# Altium PCB VCO_RAW.PcbDoc
Units mil, origin at the board's own origin, x right, y up, seen from the top; angles counter-clockwise.
Board outline 1102.36 x 3937.01 mil, 2 copper layers (Top Layer, Bottom Layer); 31 components, 18 nets, 120 pads, 37 vias.
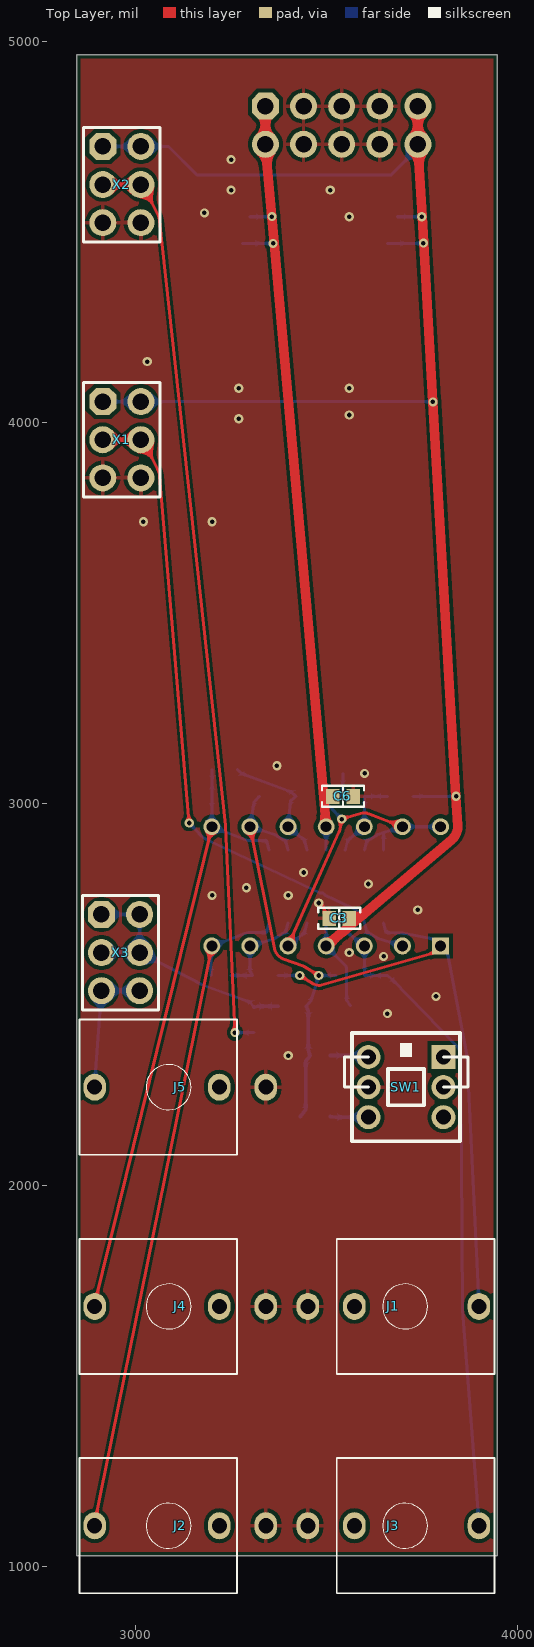
[diagram p0: Top Layer view]
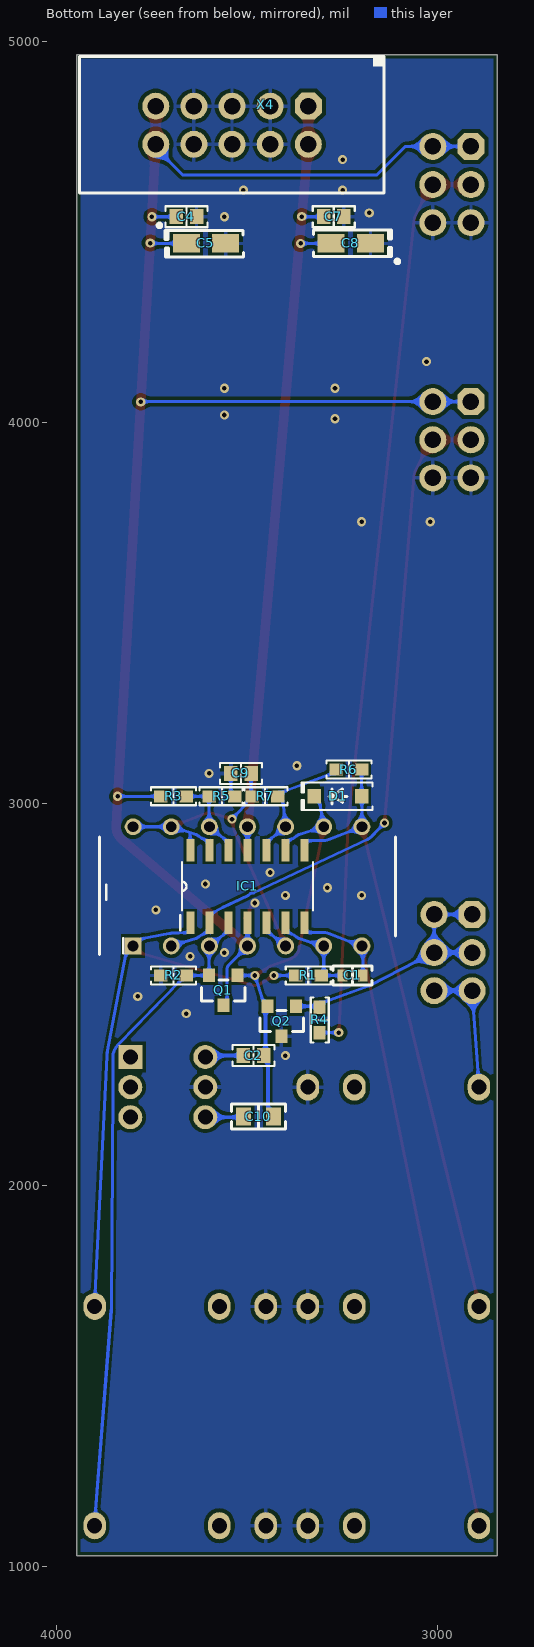
[diagram p1: Bottom Layer view, seen from below]
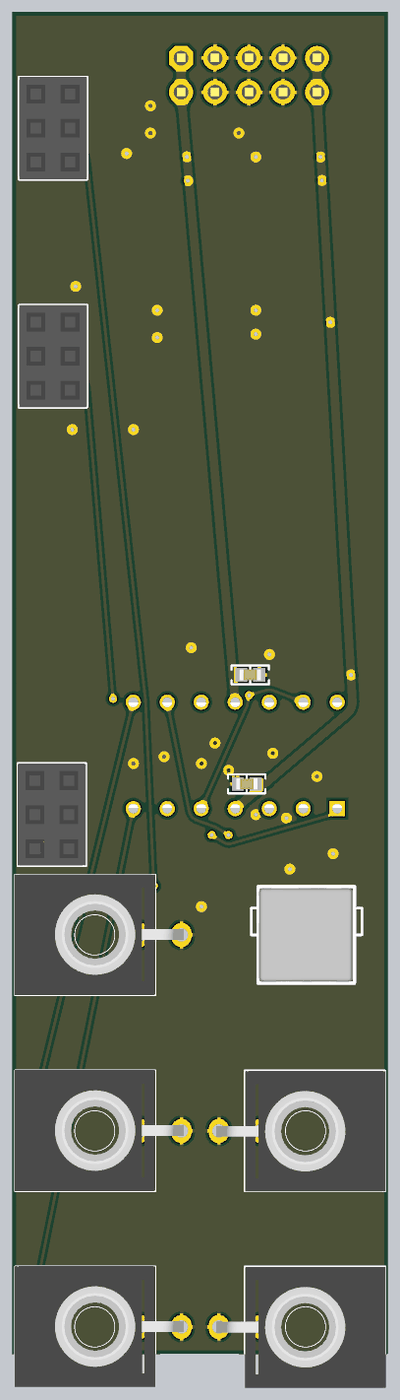
[diagram p2: 3D render of the assembled board from above, using the file's embedded part models]
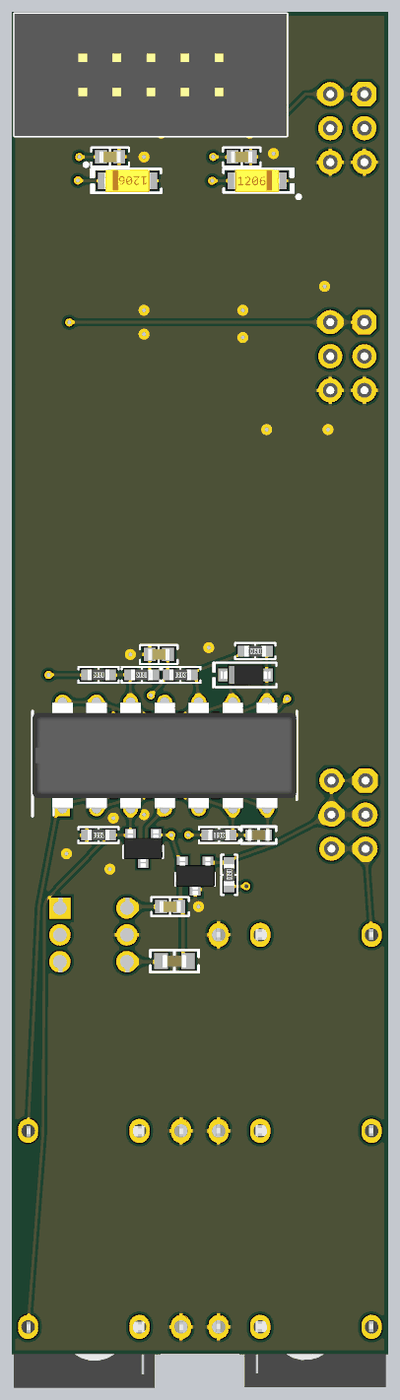
[diagram p3: 3D render of the assembled board from below, using the file's embedded part models]

## Layer stack, top to bottom
Top Solder: solder mask 0.4, Solder Resist, Dk 3.5
Top Layer: signal copper 1.4
Dielectric 1: dielectric 12.6, FR-4, Dk 4.8
Bottom Layer: signal copper 1.4
Bottom Solder: solder mask 0.4, Solder Resist, Dk 3.5

## Board outline
2845,1027.99 3947.36,1027.99 3947.36,4965 2845,4965

## Design rules (kind name [scope] priority, off if disabled: settings)
BoardOutlineClearance [All] p1: gap=10 ignorepadtopadclearanceinfootprint=FALSE except(0: Arc-SplitContinuation Track-SplitContinuation SMDPad-SplitContinuation THPad-SplitContinuation Via-SplitContinuation Fill-SplitContinuation Poly-SplitContinuation Region-SplitContinuation Text-SplitContinuation)
Clearance [All] p1: gap=10 ignorepadtopadclearanceinfootprint=FALSE except(8: Arc-Arc Arc-Track Arc-SMDPad Arc-Fill Arc-Poly Arc-Region Track-Track Track-SMDPad Track-Fill Track-Poly Track-Region SMDPad-SMDPad SMDPad-Fill SMDPad-Poly SMDPad-Region)
PolygonConnect [All] p1: thpad.connectstyle=Relief thpad.reliefconductorwidth=10 thpad.reliefentries=4 thpad.polygonreliefangle="90 Angle" thpad.airgapwidth=10 smdpad.connectstyle=Relief smdpad.reliefconductorwidth=10 smdpad.reliefentries=4 smdpad.polygonreliefangle="90 Angle" smdpad.airgapwidth=10 via.connectstyle=Direct via.reliefconductorwidth=10 via.reliefentries=4 via.polygonreliefangle="90 Angle" via.airgapwidth=10
RoutingVias [All] p1: holewidth=12 width=24 viastyle="Through Hole" minholewidth=12 minwidth=24 maxholewidth=12 maxwidth=24
SolderMaskExpansion [All] p1: expansion=4 istentingtop=FALSE
Width [All] p1: maxlimit=25 minlimit=8 preferedwidth=8
30 further rules are at their usual default settings.

## Components (designator, comment, footprint, x,y, rotation, side; value= is the part's Value field where it differs from the comment)
C1 "0.15 µF" "MURATA GCM188 0603_1608" 3223.43,2550 r180 bottom
C2 "0.22 µF" "CAP 0603_1608" 3483.43,2340 r180 bottom
C3 "0.1 µF" "CAP 0603_1608" 3533.43,2700 r0 top
C4 "0.1 µF" "CAP 0603_1608" 3659.65,4540 r0 bottom
C5 "10µF" "CAP POL 1206_3216" 3608.43,4470 r180 bottom
C6 "0.1 µF" "CAP 0603_1608" 3543.43,3020 r0 top
C7 "0.1 µF" "CAP 0603_1608" 3273.43,4540 r180 bottom
C8 "10µF" "CAP POL 1206_3216" 3228.43,4470 r0 bottom
C9 "0.22 µF" "CAP 0603_1608" 3516.57,3080 r180 bottom
C10 "2.2 µF" "MURATA GRM188 0603_1608" 3470.63,2180 r180 bottom
D1 "1N4148W-TP" SOD-123 3262.01,3020 r0 bottom
IC1 "TL074CN" DIP_SMD-14 3499.37,2783.78 r90 bottom
J1 "PWM_OUT" THONKICONN 3451.3,1681.89 r270 top
J2 "TRI_OUT" THONKICONN 3341.06,1106.73 r90 top
J3 "SAW_OUT" THONKICONN 3451.3,1106.73 r270 top
J4 "PULSE_OUT" THONKICONN 3341.06,1681.89 r90 top
J5 "CV_IN" THONKICONN 3341.06,2257.05 r90 top
Q1 "MMBT3904-7-F" "DIODES SOT-23-3" 3562.6,2510.63 r270 bottom
Q2 "MMBT3904-7-F" "DIODES SOT-23-3" 3410,2430 r270 bottom
R1 "10 kOhms" "YAGEO RES 0603_1608" 3340,2550 r180 bottom
R2 "100 kOhms" "YAGEO RES 0603_1608" 3693.46,2550 r180 bottom
R3 "10 kOhms" "YAGEO RES 0603_1608" 3693.46,3020 r0 bottom
R4 "100 kOhms" "YAGEO RES 0603_1608" 3310,2433.46 r270 bottom
R5 "10 kOhms" "YAGEO RES 0603_1608" 3566.54,3020 r0 bottom
R6 "100 kOhms" "YAGEO RES 0603_1608" 3233.46,3090 r0 bottom
R7 "10 kOhms" "YAGEO RES 0603_1608" 3453.46,3020 r180 bottom
SW1 "VCO/LFO" PB_SW_LATCH 3806.88,2335.82 r0 top
X1 "Connector, 6pin, 2.54mm, 500VAC, 3A" "CON: PBD-6" 2963.39,3955.12 r270 top
X2 "Connector, 6pin, 2.54mm, 500VAC, 3A" "CON: PBD-6" 2963.39,4624.41 r270 top
X3 "Connector, 6pin, 2.54mm, 500VAC, 3A" "CON: PBD-6" 2960,2610 r270 top
X4 "Connector, 10pin, 2.54mm, 250VAC, 3A" "CON: IDC-10MS" 3540,4780 r0 bottom

## Footprints (in the part's own frame and the unit in brackets; to place one, negate y for a bottom-side part, rotate by r counter-clockwise, add the part's x,y. Pads: shape width x height; smd on the part's side, far side on the other; paste and mask are expansions set on the pad)
"CAP 0603_1608" [mm] "Chip Capacitor, 2-Leads, Body 1.60x0.80mm, IPC Medium Density"
  rect 0.9x1 smd: 1(-0.675,0) 2(0.675,0)
  silkscreen extent -1.4,-0.7 1.4,0.7, body extent -0.8,-0.41 0.8,0.41, height 0.82
"CAP POL 1206_3216" [mm] "Molded Capacitor, 2-Leads, Body 3.20x1.6mm, IPC Medium Density"
  rect 1.8x1.23 smd: 1(-1.31,0) 2(1.31,0)
  silkscreen extent -3.22,-0.9 2.5,1.32, body extent -1.72,-0.85 1.71,0.85, height 1.7
"CON: IDC-10MS" [mm] "IDC-10MS 10 pin PCB-mount header"
  oct 1.8x1.8 hole 1.1: 1(-5.08,-1.27)
  round 1.8 hole 1.1: 2(-5.08,1.27) 3(-2.54,-1.27) 4(-2.54,1.27) 5(0,-1.27) 6(0,1.27) 7(2.54,-1.27) 8(2.54,1.27) 9(5.08,-1.27) 10(5.08,1.27)
  round 0.5 on Mech1: ""(-9.6,-4)
  silkscreen extent -10.14,-4.57 10.16,4.53, body extent -10.14,-4.57 10.16,4.53, height 9
"CON: PBD-6" [mm] "PBD-6"
  oct 1.8x1.8 hole 1.1: 1(-2.54,-1.27)
  round 1.8 hole 1.1: 2(-2.54,1.27) 3(0,-1.27) 4(0,1.27) 5(2.54,-1.27) 6(2.54,1.27)
  silkscreen extent -3.81,-2.54 3.81,2.54, body extent -3.81,-2.54 3.81,2.54, height 8.5
"DIODES SOT-23-3" [mm] "SOT23, 3-Leads, Body 2.90x2.40mm, Pitch 0.95mm, IPC Medium Density"
  rect 0.9x0.8 smd: 1(-1,0.95) 2(-1,-0.95) 3(1,0)
  silkscreen extent -0.7,-1.45 0.7,1.45, body extent -1.41,-1.45 1.41,1.45, height 1.5
DIP_SMD-14 [mm] "Combo footprint for opamps that i have"
  rect 1.13x1.13 hole 0.73: 1(-3.97,7.62)
  rect 1.5x0.533 smd: 1(-2.441,3.81) 2(-2.441,2.54) 3(-2.441,1.27) 4(-2.441,0) 5(-2.441,-1.27) 6(-2.441,-2.54) 7(-2.441,-3.81) 8(2.416,-3.81) 9(2.416,-2.54) 10(2.416,-1.27) 11(2.416,0) 12(2.416,1.27) 13(2.416,2.54) 14(2.416,3.81)
  round 1.13 hole 0.73: 2(-3.97,5.08) 3(-3.97,2.54) 4(-3.97,0) 5(-3.97,-2.54) 6(-3.97,-5.08) 7(-3.97,-7.62) 8(3.97,-7.62) 9(3.97,-5.08) 10(3.97,-2.54) 11(3.97,0) 12(3.97,2.54) 13(3.97,5.08) 14(3.97,7.62)
  silkscreen extent -4.53,-9.84 3.3,9.85, body extent -3.94,-9.84 3.94,9.84, height 5.27
"MURATA GCM188 0603_1608" [mm] "Chip Capacitor, 2-Leads, Body 1.60x0.80mm"
  rect 0.65x0.8 smd: 1(-0.675,0) 2(0.675,0)
  silkscreen extent -1.3,-0.63 1.3,0.63, body extent -0.85,-0.45 0.85,0.45, height 0.9
"MURATA GRM188 0603_1608" [mm] "Chip Capacitor, 2-Leads, Body 1.60x0.80mm"
  rect 1x1.2 smd: 1(-1,0) 2(1,0)
  silkscreen extent -1.8,-0.83 1.8,0.83, body extent -0.9,-0.5 0.9,0.5, height 1
PB_SW_LATCH [mm] "Pushbiutton switch latching DPDT SHOU HAN 7-7 ZS"
  rect 1.6x1.6 hole 1: 1(0,0)
  round 1.6 hole 1: 2(0,-2) 3(0,-4) 4(-5,0) 5(-5,-2) 6(-5,-4)
  silkscreen extent -6.6,-5.6 1.65,1.6, body extent -6.04,-5.5 0.96,1.5, height 12.4
SOD-123 [mm] "SOD, 2-Leads, Body 1.55x3.70mm, IPC Medium Density"
  rect 0.9x0.95 smd: 1(-1.575,0) 2(1.575,0)
  silkscreen extent -2.3,-0.92 2.41,0.92, body extent -1.86,-0.78 1.86,0.77, height 1.35
THONKICONN [mm]
  oval 1.8x1.5 hole 1: 1(0,0) 2(0,3.1) 3(0,11.4)
  silkscreen extent -4.5,1.92 4.5,12.42, body extent -4.47,-0.18 4.53,12.45, height 14.5
"YAGEO RES 0603_1608" [mm] "Chip Resistor, 2-Leads, Body 1.60x0.80mm"
  rect 0.9x0.8 smd: 1(-0.85,0) 2(0.85,0)
  silkscreen extent -1.5,-0.6 1.5,0.6, body extent -0.8,-0.4 0.8,0.4, height 0.45

## Part data
C1: library part GCM188R71H154KA64D, "CAP CER 0.15UF 50V X7R 0603", Device Package="0603 (1608 Metric)", Manufacturer="Murata Electronics", Operating Temperature="-55°C ~ 125°C", Ratings=AEC-Q200, Supplier Part Number 1=490-11960-1-ND, Temperature Coefficient=X7R, Tolerance=±10%, Voltage - Rated=50V, Applications=Automotive, Capacitance="0.15 µF", ComponentLink1Description=Datasheet, ComponentLink1URL=https://www.murata.com/~/media/webrenewal/support/library/catalog/products/capacitor/mlcc/c03e.ashx?la=en-us, ComponentLink2Description="DigiKey Link", ComponentLink2URL=https://www.digikey.com/en/products/detail/murata-electronics/GCM188R71H154KA64D/4903958, LastUpdated="7/20/2024 12:25:02 AM", Lifecycle Status=Active, Minimum Order=1, Mounting Type="Surface Mount, MLCC", Package / Case="0603 (1608 Metric)", Packaging=TapeAndReel, Part Number=GCM188R71H154KA64D, Part Status=Active, PartId=6776, Price=0.02, Series=GCM, Size / Dimension="0.063\" L x 0.031\" W (1.60mm x 0.80mm)", Supplier 1=DigiKey, Thickness (Max)="0.035\" (0.90mm)"
C2 C9: library part CC0603KRX7R9BB224, "CAP CER 0.22UF 50V X7R 0603", Device Package="0603 (1608 Metric)", Manufacturer=Yageo, Operating Temperature="-55°C ~ 125°C", Supplier Part Number 1=311-3374-1-ND, Temperature Coefficient=X7R, Tolerance=±10%, Voltage - Rated=50V, Applications="General Purpose", Capacitance="0.22 µF", ComponentLink1Description=Datasheet, ComponentLink1URL=https://www.yageo.com/upload/media/product/productsearch/datasheet/mlcc/UPY-GPHC_X7R_6.3V-to-50V_18.pdf, ComponentLink2Description="DigiKey Link", ComponentLink2URL=https://www.digikey.com/en/products/detail/yageo/CC0603KRX7R9BB224/5883804, LastUpdated="2/9/2024 8:10:26 PM", Lifecycle Status=Active, Minimum Order=1, Mounting Type="Surface Mount, MLCC", Package / Case="0603 (1608 Metric)", Packaging=TapeAndReel, Part Number=CC0603KRX7R9BB224, Part Status=Active, PartId=5406, Price=0.04, Series=CC, Size / Dimension="0.063\" L x 0.031\" W (1.60mm x 0.80mm)", Supplier 1=DigiKey, Thickness (Max)="0.035\" (0.90mm)"
C3 C4 C6 C7: library part C0603C104K5RAC7411, "CAP CER 0.1UF 50V X7R 0603", Device Package="0603 (1608 Metric)", Manufacturer=KEMET, Operating Temperature="-55°C ~ 125°C", Supplier Part Number 1=399-C0603C104K5RAC7411CT-ND, Temperature Coefficient=X7R, Tolerance=±10%, Voltage - Rated=50V, Applications="Bypass, Decoupling", Capacitance="0.1 µF", ComponentLink1Description=Datasheet, ComponentLink1URL=https://api.kemet.com/component-edge/download/datasheet/C0603C104K5RAC7411.pdf, ComponentLink2Description="DigiKey Link", ComponentLink2URL=https://www.digikey.com/en/products/detail/kemet/C0603C104K5RAC7411/3317013, LastUpdated="2/9/2024 8:10:30 PM", Lifecycle Status=Active, Minimum Order=1, Mounting Type="Surface Mount, MLCC", Package / Case="0603 (1608 Metric)", Packaging=TapeAndReel, Part Number=C0603C104K5RAC7411, Part Status=Active, PartId=2233, Price=0.01, Series="SMD Comm X7R", Size / Dimension="0.063\" L x 0.031\" W (1.60mm x 0.80mm)", Supplier 1=DigiKey, Thickness (Max)="0.035\" (0.90mm)"
C5 C8: library part T491A106K010AT, "CAP TANT 10UF 10% 10V 1206", Device Package="1206 (3216 Metric)", ESR (Equivalent Series Resistance)=3.8Ohm, Lifetime @ Temp.="2000 Hrs @ 125°C", Manufacturer=KEMET, Manufacturer Size Code=A, Operating Temperature="-55°C ~ 125°C", Supplier Part Number 1=399-3684-1-ND, Tolerance=±10%, Voltage - Rated=10V, Capacitance=10µF, ComponentLink1Description=Datasheet, ComponentLink1URL=https://api.kemet.com/component-edge/download/datasheet/T491A106K010AT.pdf, ComponentLink2Description="DigiKey Link", ComponentLink2URL=http://digikey.com/product-detail/en/kemet/T491A106K010AT/399-3684-1-ND/819009, Features="General Purpose", Height - Seated (Max)="0.071\" (1.80mm)", LastUpdated="9/2/2020 1:15:58 AM", Lifecycle Status=Active, Minimum Order=1, Mounting Type="Surface Mount", Package / Case="1206 (3216 Metric)", Packaging=TapeAndReel, Part Number=T491A106K010AT, Part Status=Active, PartId=330, Price=0.07, Series=T491, Size / Dimension="0.126\" L x 0.063\" W (3.20mm x 1.60mm)", Supplier 1=DigiKey, Type=Molded
C10: library part GRM188R61H225ME11D, "CAP CER 2.2UF 50V X5R 0603", Device Package="0603 (1608 Metric)", Manufacturer="Murata Electronics", Operating Temperature="-55°C ~ 85°C", Supplier Part Number 1=490-12740-1-ND, Temperature Coefficient=X5R, Tolerance=±20%, Voltage - Rated=50V, Applications="General Purpose", Capacitance="2.2 µF", ComponentLink1Description=Datasheet, ComponentLink1URL=https://search.murata.co.jp/Ceramy/image/img/A01X/G101/ENG/GRM188R61H225ME11-01.pdf, ComponentLink2Description="DigiKey Link", ComponentLink2URL=https://www.digikey.com/en/products/detail/murata-electronics/GRM188R61H225ME11D/4905365, LastUpdated="7/20/2024 12:23:20 AM", Lifecycle Status=Active, Minimum Order=1, Mounting Type="Surface Mount, MLCC", Package / Case="0603 (1608 Metric)", Packaging=TapeAndReel, Part Number=GRM188R61H225ME11D, Part Status=Active, PartId=12610, Price=0.03, Series=GRM, Size / Dimension="0.063\" L x 0.031\" W (1.60mm x 0.80mm)", Supplier 1=DigiKey, Thickness (Max)="0.039\" (1.00mm)"
D1: "DIODE GEN PURP 100V 150MA SOD123", Capacitance @ Vr, F="2pF @ 0V, 1MHz", Current - Average Rectified (Io)=150mA, Current - Reverse Leakage @ Vr="1 µA @ 75 V", Manufacturer="Micro Commercial Co", Operating Temperature - Junction="-65°C ~ 150°C", Package / Case=SOD-123, Supplier Part Number 1=1N4148WTPMSCT-ND, Voltage - DC Reverse (Vr) (Max)="100 V", Voltage - Forward (Vf) (Max) @ If="1.25 V @ 150 mA", ComponentLink1Description=Datasheet, ComponentLink1URL=https://www.mccsemi.com/pdf/Products/1N4148W(SOD123).pdf, ComponentLink2Description="DigiKey Link", ComponentLink2URL=https://www.digikey.com/en/products/detail/micro-commercial-co/1N4148W-TP/717196, Diode Type=Standard, LastUpdated="6/3/2024 7:54:46 PM", Lifecycle Status=Active, Minimum Order=1, Mounting Type="Surface Mount", Packaging=TapeAndReel, Part Number=1N4148W-TP, Part Status=Active, PartId=999, Price=0.01, Reverse Recovery Time (trr)="4 ns", Series=-, Speed="Small Signal =< 200mA (Io), Any Speed", Supplier 1=DigiKey, Supplier Device Package=SOD-123
IC1: "Integrated Circuit", Manufacturer_Name="Texas Instruments", Mouser Part Number=595-TL074CN, Arrow Part Number=TL074CN, Arrow Price/Stock=https://www.arrow.com/en/products/tl074cn/texas-instruments?utm_currency=USD&region=nac, Datasheet Link=https://www.ti.com/lit/ds/symlink/tl074.pdf?HQS=TI-null-null-mousermode-df-pf-null-wwe&ts=1598513500878&ref_url=https%253A%252F%252Feu.mouser.com%252F, Height=5.08mm, Manufacturer_Part_Number=TL074CN, Mouser Price/Stock=https://www.mouser.co.uk/ProductDetail/Texas-Instruments/TL074CN?qs=AMJt07B76uv7dLYnj7iLiQ%3D%3D
J1 J2 J3 J4 J5: library part PJ-301M-3P, "THONKICONN metal"
Q1 Q2: "TRANS NPN 40V 0.2A SOT23-3", Current - Collector (Ic) (Max)="200 mA", Current - Collector Cutoff (Max)="50nA (ICBO)", DC Current Gain (hFE) (Min) @ Ic, Vce="100 @ 10mA, 1V", Frequency - Transition=300MHz, Manufacturer="Diodes Incorporated", Operating Temperature="-55°C ~ 150°C (TJ)", Package / Case="TO-236-3, SC-59, SOT-23-3", Power - Max="300 mW", Supplier Device Package=SOT-23-3, Supplier Part Number 1=MMBT3904-FDICT-ND, Voltage - Collector Emitter Breakdown (Max)="40 V", ComponentLink1Description=Datasheet, ComponentLink1URL=https://www.diodes.com/assets/Datasheets/ds30036.pdf, ComponentLink2Description="DigiKey Link", ComponentLink2URL=https://www.digikey.com/en/products/detail/diodes-incorporated/MMBT3904-7-F/814494, LastUpdated="2/8/2024 9:54:04 PM", Lifecycle Status=Active, Minimum Order=1, Mounting Type="Surface Mount", Packaging=TapeAndReel, Part Number=MMBT3904-7-F, Part Status=Active, PartId=85, Price=0.01, Series=-, Supplier 1=DigiKey, Transistor Type=NPN, Vce Saturation (Max) @ Ib, Ic="300mV @ 5mA, 50mA"
R1 R3 R5 R7: library part AA0603FR-0710KL, "RES SMD 10K OHM 1% 1/10W 0603", Device Package="0603 (1608 Metric)", Manufacturer=Yageo, Operating Temperature="-55°C ~ 155°C", Power (Watts)="0.1W, 1/10W", Ratings=AEC-Q200, Supplier Device Package=0603, Supplier Part Number 1=13-AA0603FR-0710KLCT-ND, Temperature Coefficient=±150ppm/°C, Tolerance=±1%, ComponentLink1Description=Datasheet, ComponentLink1URL=https://www.yageo.com/upload/media/product/productsearch/datasheet/rchip/PYu-AA_51_RoHS_L_3.pdf, ComponentLink2Description="DigiKey Link", ComponentLink2URL=https://www.digikey.com/en/products/detail/yageo/AA0603FR-0710KL/5888698, Composition="Thick Film", Features="Anti-Sulfur, Automotive AEC-Q200, Moisture Resistant", Height - Seated (Max)="0.022\" (0.55mm)", LastUpdated="7/25/2024 9:19:15 AM", Lifecycle Status=Active, Minimum Order=1, Number of Terminations=2, Package / Case="0603 (1608 Metric)", Packaging=TapeAndReel, Part Number=AA0603FR-0710KL, Part Status=Active, PartId=64302, Price=0.01, Resistance="10 kOhms", Series=AA, Size / Dimension="0.063\" L x 0.031\" W (1.60mm x 0.80mm)", Supplier 1=DigiKey
R2 R4 R6: library part AA0603FR-07100KL, "RES SMD 100K OHM 1% 1/10W 0603", Device Package="0603 (1608 Metric)", Manufacturer=Yageo, Operating Temperature="-55°C ~ 155°C", Power (Watts)="0.1W, 1/10W", Ratings=AEC-Q200, Supplier Device Package=0603, Supplier Part Number 1=13-AA0603FR-07100KLCT-ND, Temperature Coefficient=±150ppm/°C, Tolerance=±1%, ComponentLink1Description=Datasheet, ComponentLink1URL=https://www.yageo.com/upload/media/product/productsearch/datasheet/rchip/PYu-AA_51_RoHS_L_3.pdf, ComponentLink2Description="DigiKey Link", ComponentLink2URL=https://www.digikey.com/en/products/detail/yageo/AA0603FR-07100KL/5888687, Composition="Thick Film", Features="Anti-Sulfur, Automotive AEC-Q200, Moisture Resistant", Height - Seated (Max)="0.022\" (0.55mm)", LastUpdated="7/25/2024 9:19:03 AM", Lifecycle Status=Active, Minimum Order=1, Number of Terminations=2, Package / Case="0603 (1608 Metric)", Packaging=TapeAndReel, Part Number=AA0603FR-07100KL, PartId=78895, Price=0.01, Resistance="100 kOhms", Series=AA, Size / Dimension="0.063\" L x 0.031\" W (1.60mm x 0.80mm)", Supplier 1=DigiKey
SW1: library part Push_SW_DPDT
X1 X2 X3: library part PBD-6, CurrentMax=3A, Manufacturer=Connfly, VoltageMax=500VAC, CommentText="\"Разъем\"", helpurl=https://www.chipdip.ru/product/pbd-6, Multichannel=6pin, PartNumber=PBD-6, Pitch=2.54mm, TypeConnector=Connector, ValueManufacturerPartNumber="Connector, 6pin, 2.54mm, 500VAC, 3A"
X4: library part IDC-10, CurrentMax=3A, Manufacturer=Connfly, VoltageMax=250VAC, CommentText="\"Разъем\"", helpurl=https://www.chipdip.ru/product/idc-10ms, Multichannel=10pin, PartNumber=IDC-10, Pitch=2.54mm, TypeConnector=Connector, ValueManufacturerPartNumber="Connector, 10pin, 2.54mm, 250VAC, 3A"

## Via types
v1: diameter 24, hole 12, Top Layer to Bottom Layer, 37 vias

## Nets (pads, with @x,y where several pads share a name; then routed paths per layer and width w, separated by ;. In a path a pad name is that pad's centre, name@x,y a point inside that pad or via, vN(x,y) a via of type N, cw(c..) or ccw(c..) an arc to the next point about the centre after c; other vN are vias at no path point)
-12: C6.1 C7.1 C8.2 IC1.11 X4.1 X4.2 | length 2095.3
  Top Layer w25: X4.1 3340,4807.07 X4.2 3340,4729.9 ccw(c3365,4730) 3340.09,4727.82 3356.81,4540.26 3363.04,4470.27 3492.44,3017.83 IC1.11@3499.37,2940.08
  Bottom Layer w8: C8.2 v1(3360,4470) ; C7.1 3356.69,4540 v1(3356.97,4540.28) ; IC1.11@3499.37,2878.89 3499.37,2904.42 IC1.11@3499.37,2940.08
CV_B: J5.3 X3.5 X3.6 | length 353.6
  Bottom Layer w8: J5.3 2892.24,2262.95 X3.5 X3.6
CV_T: Q2.1 R4.1 X3.1 X3.2 X3.3 X3.4 | length 697.7
  Bottom Layer w8: X3.3 X3.4 ; X3.1 X3.2 X3.4 ; R4.1 3298.25,2480.65 3180.01,2522.95 cw(c3184.05,2534.25) 3178.53,2523.6 3013.67,2609.11 ccw(c3010,2602) X3.4
  Bottom Layer w10: R4.1 3320.75,2469.37 Q2.1
FREQ_B: C3.1 C4.1 C5.2 C6.2 C7.2 C8.1 C9.1 J1.1 J2.1 J3.1 J4.1 J5.1 Q2.3 R2.1 R5.1 SW1.5 X1.5 X1.6 X2.5 X2.6 X4.3 X4.4 X4.5 X4.6 X4.7 X4.8 | length 114.9
  Top Layer w8: v1(3480,2740) 3494.24,2725.76 3494.24,2712.61 C3.1
  Bottom Layer w8: R5.1 3543.15,3031.75 C9.1
  other v1: 3400,2340 3660,2450 3787.42,2495.27 3650,2600 3560,2610 3739.56,2721.86 3200,2760 3400,2760 3290,2780 3610,2790 3440,2820 3600,3080 3370,3100 3020,3740 3200,3740 3270,4010 3560,4020 3270,4090 3560,4090 3030,4160 3560,4540 3180,4550 3250,4610 3510,4610 3250,4690
FREQ_T: C3.2 C4.2 C5.1 IC1.4 Q1.3 R3.2 X1.1 X1.2 X2.1 X2.2 X4.9 X4.10 | length 4637.7
  Top Layer w25: IC1.4@3499.37,2627.48 3828.28,2905.93 ccw(c3799.37,2940.08) 3844.04,2942.68 3839.54,3019.97 3779.29,4054.57 3755.04,4470.98 3751.02,4540.06 3740.04,4728.61 cw(c3765,4730) X4.10 X4.9
  Bottom Layer w8: X1.1 3778.67,4055.12 v1(3779.22,4054.56) ; X2.1 X2.2 3085.59,4724.41 3160,4650 3670,4650 3740,4720 X4.10 ; IC1.4@3499.37,2687.69 3499.37,2662.16 3499.37,2627.48 3549.53,2576.1 cw(c3540.94,2567.72) 3552.94,2567.72 3552.94,2484.98 Q1.3 ; C5.1 3753.49,4470 v1(3754.43,4470.94) ; C4.2 v1(3750,4540) ; R3.2 v1(3840,3020)
FREQ_W: R4.2 X2.3 X2.4 | length 2398.4
  Top Layer w8: X2.3 X2.4 cw(c3013.39,4616.41) 3020.53,4620.01 3057.48,4546.75 cw(c3013.39,4524.41) 3062.53,4529.77 3235.4,2944.01 cw(c3199.37,2940.08) 3235.58,2941.71 v1(3260,2400)
  Bottom Layer w8: v1(3260,2400) R4.2
NetC1_1: C1.1 IC1.6 R1.2 | length 266.1
  Bottom Layer w8: C1.1 3258.8,2550 3292.82,2550 R1.2 3299.37,2561.75 IC1.6@3299.37,2627.48 ; IC1.6@3399.37,2687.69 3392.87,2662.16 3392.28,2662.04 ccw(c3399.37,2626.5) 3379.25,2656.64 3366.52,2648.17 cw(c3359.87,2658.16) 3363.52,2646.72 3303.29,2627.73 cw(c3300.83,2635.35) IC1.6@3299.37,2627.48 ; IC1.6@3299.37,2626.5 IC1.6@3299.37,2627.48 ; IC1.6@3299.37,2626.5 3299.65,2626.59 IC1.6@3299.37,2627.48 ; IC1.6@3299.37,2626.5 IC1.6@3299.37,2627.48
NetC1_2: C1.2 IC1.7 J2.3 | length 1806.2
  Top Layer w8: J2.3 2892.24,1112.64 IC1.7@3199.37,2627.48
  Bottom Layer w8: C1.2 3196.85,2561.75 3196.85,2620.54 cw(c3204.85,2620.5) 3197.67,2624.04 IC1.7@3199.37,2627.48 ; IC1.7@3199.7,2626.63 IC1.7@3199.37,2627.48 ; IC1.7@3349.37,2687.69 3342.87,2662.74 3299.37,2662.74 ccw(c3299.37,2626.5) 3286.23,2660.28 3203.21,2627.99 cw(c3200.27,2635.43) IC1.7@3199.37,2627.48
NetC2_1: C2.1 SW1.4 | length 100.4
  Bottom Layer w10: C2.1 3583.55,2340 SW1.4
NetC2_2: C2.2 C10.2 D1.2 IC1.9 Q1.1 Q2.2 | length 1112.7
  Top Layer w8: IC1.9@3299.37,2940.08 3363.84,2620.32 ccw(c3399.37,2627.48) 3386.92,2593.44 3438.93,2574.42 cw(c3430,2550) 3443.52,2572.21 v1(3480,2550)
  Bottom Layer w8: D1.2 3310.3,3005.3 3299.37,2940.08 3363.48,2919.86 cw(c3359.87,2908.42) 3366.52,2918.41 3379.25,2909.93 ccw(c3399.37,2940.08) 3392.27,2904.54 3392.87,2904.42 IC1.9@3399.37,2878.89 ; Q2.2 3459.15,2483.09 v1(3480,2550) 3513.45,2550 Q1.1
  Bottom Layer w10: C10.2 3445.94,2198.62 3445.94,2325.31 C2.2 3452.26,2354.68 3452.26,2456.65 Q2.2
NetC9_2: C9.2 IC1.5 IC1.13 IC1.14 R7.1 | length 1026.8
  Top Layer w8: IC1.5@3399.37,2627.48 3532.46,2925.29 ccw(c3499.37,2940.08) 3534.99,2933.37 v1(3540,2960) 3543.71,2961.74 cw(c3547.1,2954.49) 3544.87,2962.18 3589.39,2974.92 cw(c3599.37,2940.08) 3612.51,2973.86 IC1.13@3699.37,2940.08
  Bottom Layer w8: IC1.5@3399.85,2626.89 3399.37,2627.48 3442.87,2662.16 IC1.5@3449.37,2687.68 ; C9.2 3490,3064.32 3490,3031.75 R7.1 3500.65,3008.25 3504.3,2999.59 ccw(c3515.35,3004.25) 3506.55,2996.1 v1(3540,2960) ; IC1.13@3599.37,2878.89 3605.87,2904.42 3606.56,2904.56 ccw(c3599.37,2940.08) 3619.38,2909.86 3632.22,2918.41 cw(c3638.87,2908.42) 3635.26,2919.86 3650,2924.51 ; IC1.14@3649.37,2878.89 3649.88,2904.42 3649.88,2918.61 cw(c3657.88,2918.61) 3649.88,2918.79 3650,2923.99 ccw(c3642,2924.17) 3650,2924.17 3650,2924.51 ; IC1.14@3799.37,2940.08 3699.37,2940.08 3650,2924.51
NetC10_1: C10.1 SW1.6 | length 100.1
  Bottom Layer w10: C10.1 3524.69,2178.34 SW1.6
NetD1_1: D1.1 IC1.8 J4.3 R6.1 | length 1621.2
  Top Layer w8: J4.3 2892.24,1687.8 IC1.8@3199.37,2940.08
  Bottom Layer w8: R6.1 3200,3078.25 3200,3034.7 D1.1 3199.37,3005.3 3199.37,2940.08 3286.34,2906.26 ccw(c3299.37,2940.08) 3299.37,2903.83 3342.87,2903.83 IC1.8@3349.37,2878.89
NetIC1_1: IC1.1 J1.3 R1.1 | length 1590.2
  Top Layer w8: v1(3430,2550) 3466.48,2527.79 ccw(c3480,2550) 3487.16,2525.01 3781.13,2609.24 IC1.1@3799.37,2627.48
  Bottom Layer w8: R1.1 v1(3430,2550) ; IC1.1@3649.37,2687.69 3655.87,2662.16 3700.47,2660.72 cw(c3699.37,2626.5) 3705.8,2660.13 3781.13,2645.72 IC1.1@3799.05,2626.61 ; IC1.1@3799.37,2627.48 3817.61,2609.24 3867.31,2347.28 cw(c3806.89,2335.82) 3868.31,2338.82 3900.12,1687.8 J1.3
NetIC1_3: IC1.3 J3.3 Q1.2 R2.2 | length 1743
  Bottom Layer w8: IC1.3@3549.37,2687.69 3555.87,2662.16 3596.29,2629.02 ccw(c3601.33,2635.24) IC1.3@3599.37,2627.48 ; J3.3 3900.12,1112.64 3856.72,1672.62 cw(c3900.12,1675.98) 3856.59,1675.62 3852.38,2257.08 3852.38,2335.82 ccw(c3806.89,2335.82) 3839.53,2367.52 3673.72,2538.25 R2.2 3646.28,2550 3611.75,2550 Q1.2 3600,2563.72 3600,2622.23 ccw(c3592,2622.19) 3599.93,2623.24 IC1.3@3599.37,2627.48 ; IC1.3@3599.37,2627.48 3598.89,2626.89 IC1.3@3599.37,2627.48
NetIC1_10: IC1.10 R6.2 R7.2 | length 339.3
  Bottom Layer w8: R6.2 3280.65,3078.25 3406.28,3031.75 R7.2 3406.28,3008.25 3399.37,2940.08 3442.87,2904.42 IC1.10@3449.37,2878.89
NetIC1_12: IC1.12 R3.1 R5.2 | length 222.6
  Bottom Layer w8: IC1.12@3549.37,2878.89 3555.87,2904.42 3599.37,2940.08 3599.88,2943.02 ccw(c3592,2944.38) 3600,2944.34 3600,3008.25 R5.2 R3.1
PWM_W: IC1.2 X1.3 X1.4 | length 1790.8
  Top Layer w8: X1.3 X1.4 cw(c3013.39,3947.12) 3020.53,3950.72 3057.48,3877.46 cw(c3013.39,3855.12) 3062.64,3859.31 v1(3140,2950)
  Bottom Layer w8: v1(3140,2950) 3173.07,2915.13 ccw(c3199.37,2940.08) 3183.94,2907.28 3482.72,2766.76 ccw(c3486.12,2774) 3486.12,2766 3490.77,2766 3495.5,2761.27 ccw(c3501.15,2766.93) 3497.75,2759.69 3564.98,2728.07 cw(c3559.87,2717.21) 3565.52,2727.8 3592.87,2713.21 3599.37,2687.68 3605.87,2662.16 3606.45,2662.04 cw(c3599.37,2626.5) 3619.45,2656.67 3632.28,2648.13 ccw(c3638.87,2658.16) 3635.42,2646.66 IC1.2@3699.37,2627.48
pads on no net: J1.2 J2.2 J3.2 J4.2 J5.2 SW1.1 SW1.2 SW1.3 X4.

## Polygon pours and split planes (outlines as drawn)
FREQ_B on Top Layer "NONET_L02_P-001" (solid, pour order 0): 2840,4970 2840,1030 3940,1030 3950,1040 3950,4960
FREQ_B on Bottom Layer "NONET_L02_P-001" (solid, remove dead copper, pour order 1): 2840,4970 2840,1030 3940,1030 3950,1040 3950,4960

## Silkscreen, mask and mechanical layers (free items; w line width, h text height)
Board Shape:
  the board outline again, w1